# Altium PCB Breakout_Board.PcbDoc
Units mm, origin at the board's own origin, x right, y up, seen from the top; angles counter-clockwise.
Board outline 30.1 x 19.43 mm, 2 copper layers (Top Layer, Bottom Layer), stack 1.448 mm thick; 2 components, 8 nets, 23 pads, 3 vias.
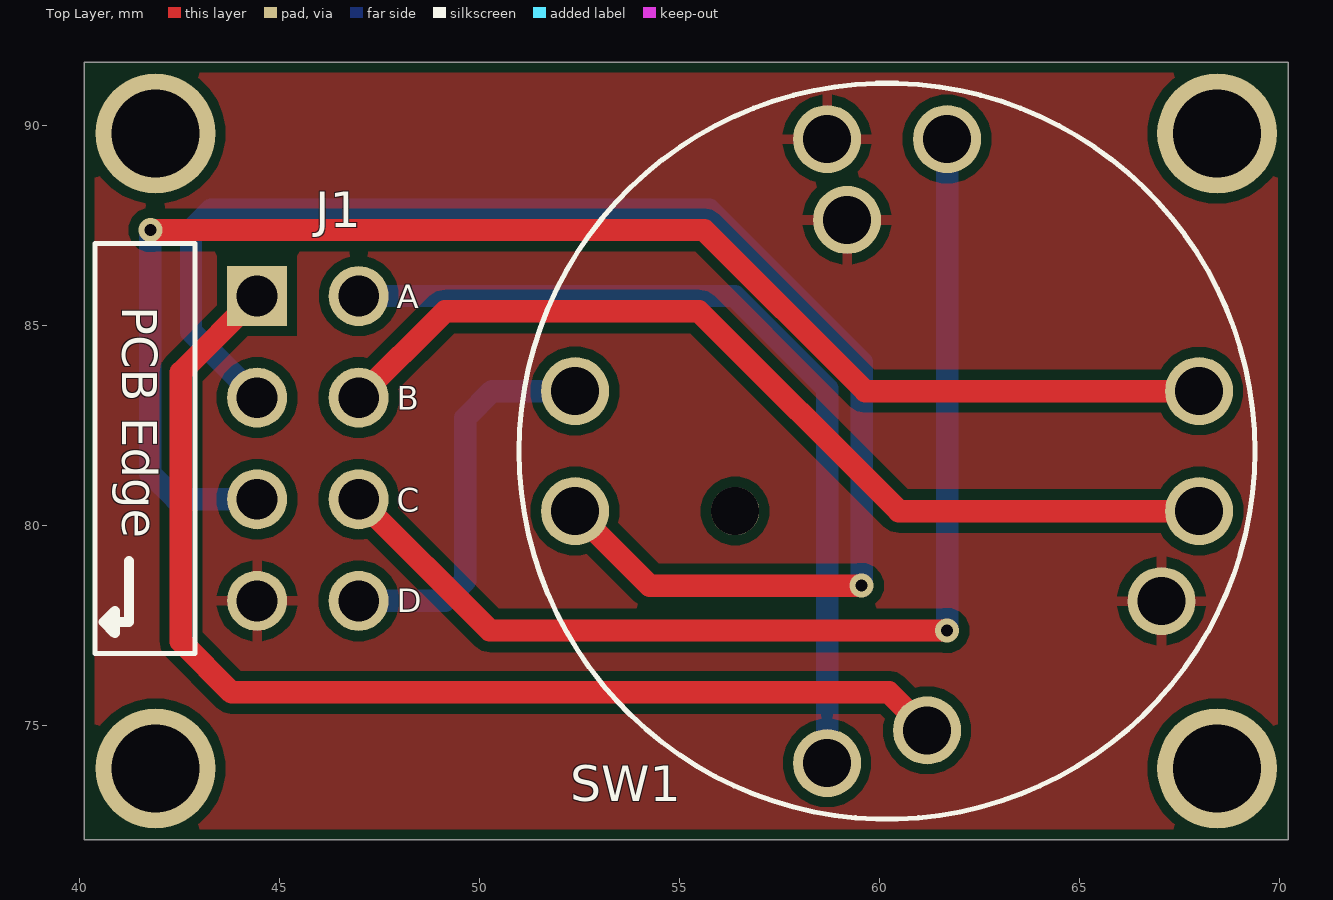
[diagram p0: Top Layer view]
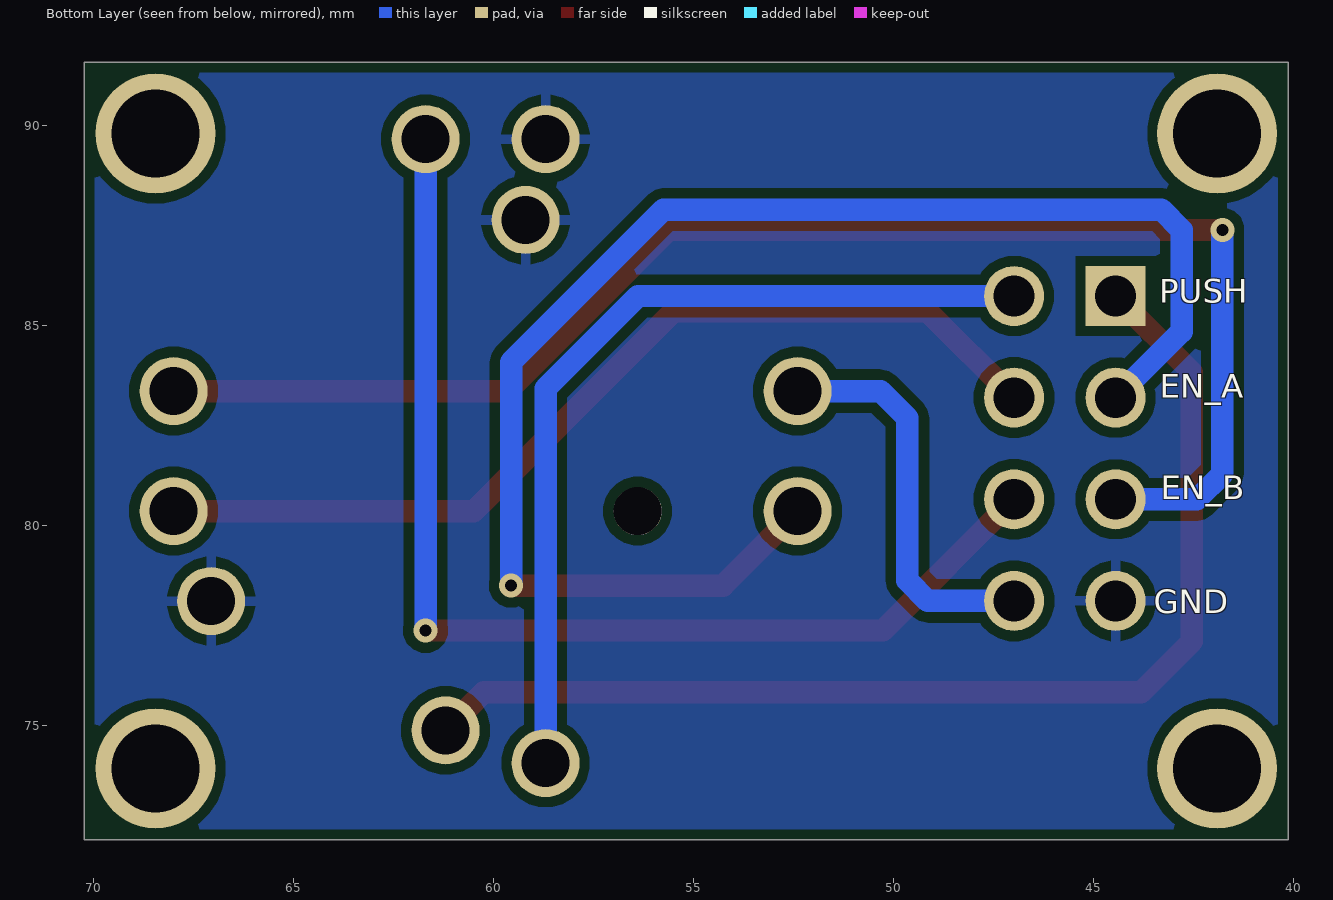
[diagram p1: Bottom Layer view, seen from below]

## Layer stack, top to bottom
Top Solder: solder mask 0.0762, Solder Resist, Dk 3.5
Top Layer: signal copper 0.254
Dielectric 1: dielectric 0.9398, FR-4, Dk 4.8
Bottom Layer: signal copper 0.254
Bottom Solder: solder mask 0.0762, Solder Resist, Dk 3.5

## Board outline
40.132,72.136 70.231,72.136 70.231,91.567 40.132,91.567

## Design rules (kind name [scope] priority, off if disabled: settings)
BoardOutlineClearance [All] p1: gap=0 ignorepadtopadclearanceinfootprint=FALSE except(0.254: Poly-OutlineEdge)
Clearance [All] p1: gap=0.254 ignorepadtopadclearanceinfootprint=FALSE except(0: Arc-Hole Track-Hole SMDPad-Hole THPad-Hole Via-Hole Fill-Hole Poly-Hole Region-Hole Text-Hole)
MinimumSolderMaskSliver [All] p1: minsoldermaskwidth=0
PolygonConnect [All] p1: connectstyle=Relief reliefconductorwidth=0.254 reliefentries=4 polygonreliefangle="90 Angle" airgapwidth=0.254
RoutingVias [All] p1: holewidth=0.3 width=0.6 viastyle="Through Hole" minholewidth=0.3 minwidth=0.6 maxholewidth=0.3 maxwidth=0.6
SilkToSilkClearance [All] p1: silktosilkclearance=0
SilkToSolderMaskClearance [IsPad] p1: minsilkscreentomaskgap=0 clearancetoexposedcopper=TRUE
SolderMaskExpansion [All] p1: expansion=0.102 istentingtop=FALSE
UnRoutedNet [All] p1: checkbadconnections=TRUE
Width [All] p1: maxlimit=0.559 minlimit=0.254 preferedwidth=0.559
26 further rules are at their usual default settings.

## Components (designator, comment, footprint, x,y, rotation, side; value= is the part's Value field where it differs from the comment)
J1 "PZ254-2-04-W-8.5" PZ254-2-04-W-8.5 45.72,81.915 r270 top
SW1 "RKJXT1F42001" RKJXT1F42001 60.2,81.848 r0 top

## Footprints (in the part's own frame and the unit in brackets; to place one, negate y for a bottom-side part, rotate by r counter-clockwise, add the part's x,y. Pads: shape width x height; smd on the part's side, far side on the other; paste and mask are expansions set on the pad)
PZ254-2-04-W-8.5 [mm]
  rect 1.5x1.5 hole 1.02: 1(-3.81,-1.27)
  round 1.5 hole 1.02: 2(-3.81,1.27) 3(-1.27,-1.27) 4(-1.27,1.27) 5(1.27,-1.27) 6(1.27,1.27) 7(3.81,-1.27) 8(3.81,1.27)
  silkscreen extent -5.13,-5.32 5.13,-2.82, body extent -5.08,-13.38 5.08,1.62, height 4.42
RKJXT1F42001 [mm]
  round 1.7 hole 1.2: A(-1.5,-7.8) B(7.8,-1.5) C(1.5,7.8) COM(-1,5.78) D(-7.8,1.5) EN_A(-7.8,-1.5) EN_B(7.8,1.5) EN_COM(-1.5,7.8) GND(6.86,-3.75) PUSH(1,-6.98)
  round 1.2 hole 1.2 unplated: ""(-3.8,-1.5)
  silkscreen extent -9.2,-9.2 9.2,9.2, body extent -8.6,-8.6 8.6,8.6, height 17.4

## Part data
J1: "3A Right-Angle Square Pins 2.5mm 260℃@10S 8P 6mm -40℃~+105℃ 2.54mm 双排 Black 2.54mm 2x4P Push-Pull,P=2.54mm Pin Headers ROHS", LCSC Part No=C2894984, Manufacturer=HCTL, ComponentLink1Description=LCSC, ComponentLink1URL=https://www.lcsc.com/product-detail/Pin-Headers_HCTL-PZ254-2-04-W-8-5_C2894984.html, Item Type=Push-Pull,P=2.54mm, Manufacturer Part Number=PZ254-2-04-W-8.5
SW1: "Electromechanical Switch 4-Directional Stick Switch 0.01A Bulk", Manufacturer="Alps Alpine", Supplier Part Number=688-RKJXT1F42001, Category="Pushbutton Switches", ComponentLink1Description=https://datasheet.ciiva.com/16197/rkjxt-16197381.pdf?src-supplier=Onlinecomponents.com, ComponentLink1URL=https://datasheet.ciiva.com/16197/rkjxt-16197381.pdf?src-supplier=Onlinecomponents.com, Item Type=Switch, Manufacturer Part Number=RKJXT1F42001, Pricing="1=8.44, 10=7.1, 25=6.33, 50=6.33, 100=5.99, 250=5.75, 1000=5.75, 10000=5.75 (USD)", RoHS=Yes, Stock=1987, Supplier=Mouser

## Free pads (board coordinates)
  round 3 hole 2.2: MH(41.91,73.914) MH(41.91,89.789) MH(68.453,73.914) MH(68.453,89.789)

## Via types
v1: diameter 0.6, hole 0.3, Top Layer to Bottom Layer, tented both sides, 3 vias

## Nets (pads, with @x,y where several pads share a name; then routed paths per layer and width w, separated by ;. In a path a pad name is that pad's centre, name@x,y a point inside that pad or via, vN(x,y) a via of type N, cw(c..) or ccw(c..) an arc to the next point about the centre after c; other vN are vias at no path point)
A: J1.2 SW1.A | length 22
  Bottom Layer w0.559: J1.2 56.388,85.725 58.7,83.413 SW1.A
B: J1.4 SW1.B | length 24
  Top Layer w0.559: J1.4 49.149,85.344 55.499,85.344 60.495,80.348 SW1.B
C: J1.6 SW1.C | length 28.4
  Top Layer w0.559: J1.6 50.27,77.365 v1(61.7,77.365)
  Bottom Layer w0.559: v1(61.7,77.365) SW1.C
D: J1.8 SW1.D | length 10
  Bottom Layer w0.559: J1.8 49.149,78.105 49.657,78.613 49.657,82.677 50.328,83.348 SW1.D
EN_A: J1.3 SW1.EN_A | length 36.9
  Top Layer w0.559: SW1.EN_A 54.262,78.486 v1(59.563,78.486)
  Bottom Layer w0.559: J1.3 42.799,84.836 42.799,87.376 43.307,87.884 55.753,87.884 59.563,84.074 v1(59.563,78.486)
EN_B: J1.5 SW1.EN_B | length 36.9
  Top Layer w0.559: v1(41.783,87.376) 55.626,87.376 59.654,83.348 SW1.EN_B
  Bottom Layer w0.559: v1(41.783,87.376) 41.783,81.28 42.418,80.645 J1.5
GND: J1.7 SW1.COM SW1.EN_COM SW1.GND
PUSH: J1.1 SW1.PUSH | length 29
  Top Layer w0.559: J1.1 42.545,83.82 42.545,77.089 43.815,75.819 60.249,75.819 SW1.PUSH
pads on no net: SW1.

## Polygon pours and split planes (outlines as drawn)
GND on Bottom Layer "GND_L02_P001" (solid, remove dead copper, pour order 1): 40.132,72.263 70.231,72.263 70.231,91.567 40.132,91.567
GND on Top Layer "GND_L01_P000" (solid, remove dead copper, pour order 0): 40.132,72.263 70.231,72.263 70.231,91.567 40.132,91.567

## Silkscreen, mask and mechanical layers (free items; w line width, h text height)
Top Overlay:
  text "A" at 47.942,85.217 h1.02
  text "B" at 47.942,82.677 h1.02
  text "C" at 47.942,80.137 h1.02
  text "D" at 47.942,77.62 h1.02
Bottom Overlay:
  text "PUSH" at 43.358,85.356 h1.02
  text "EN_A" at 43.341,82.983 h1.02
  text "EN_B" at 43.32,80.443 h1.02
  text "GND" at 43.497,77.597 h1.02
Board_Outline:
  the board outline again, w0.127

## Text inside footprints (layer, text, board x,y; h text height)
J1: Top Overlay "PCB Edge" at 40.795,85.471 h1.5 r270